# Altium PCB FG23_diff_PA_match_PCB.PcbDoc (part 2 of 2)
Units mil, origin at the board's own origin, x right, y up, seen from the top; angles counter-clockwise.
Board outline 1181.1 x 1771.65 mil, 4 copper layers (Top Layer, Signal Layer 2, Signal Layer 3, Bottom Layer), stack 62.992 mil thick; 85 components, 79 nets, 311 pads, 463 vias.
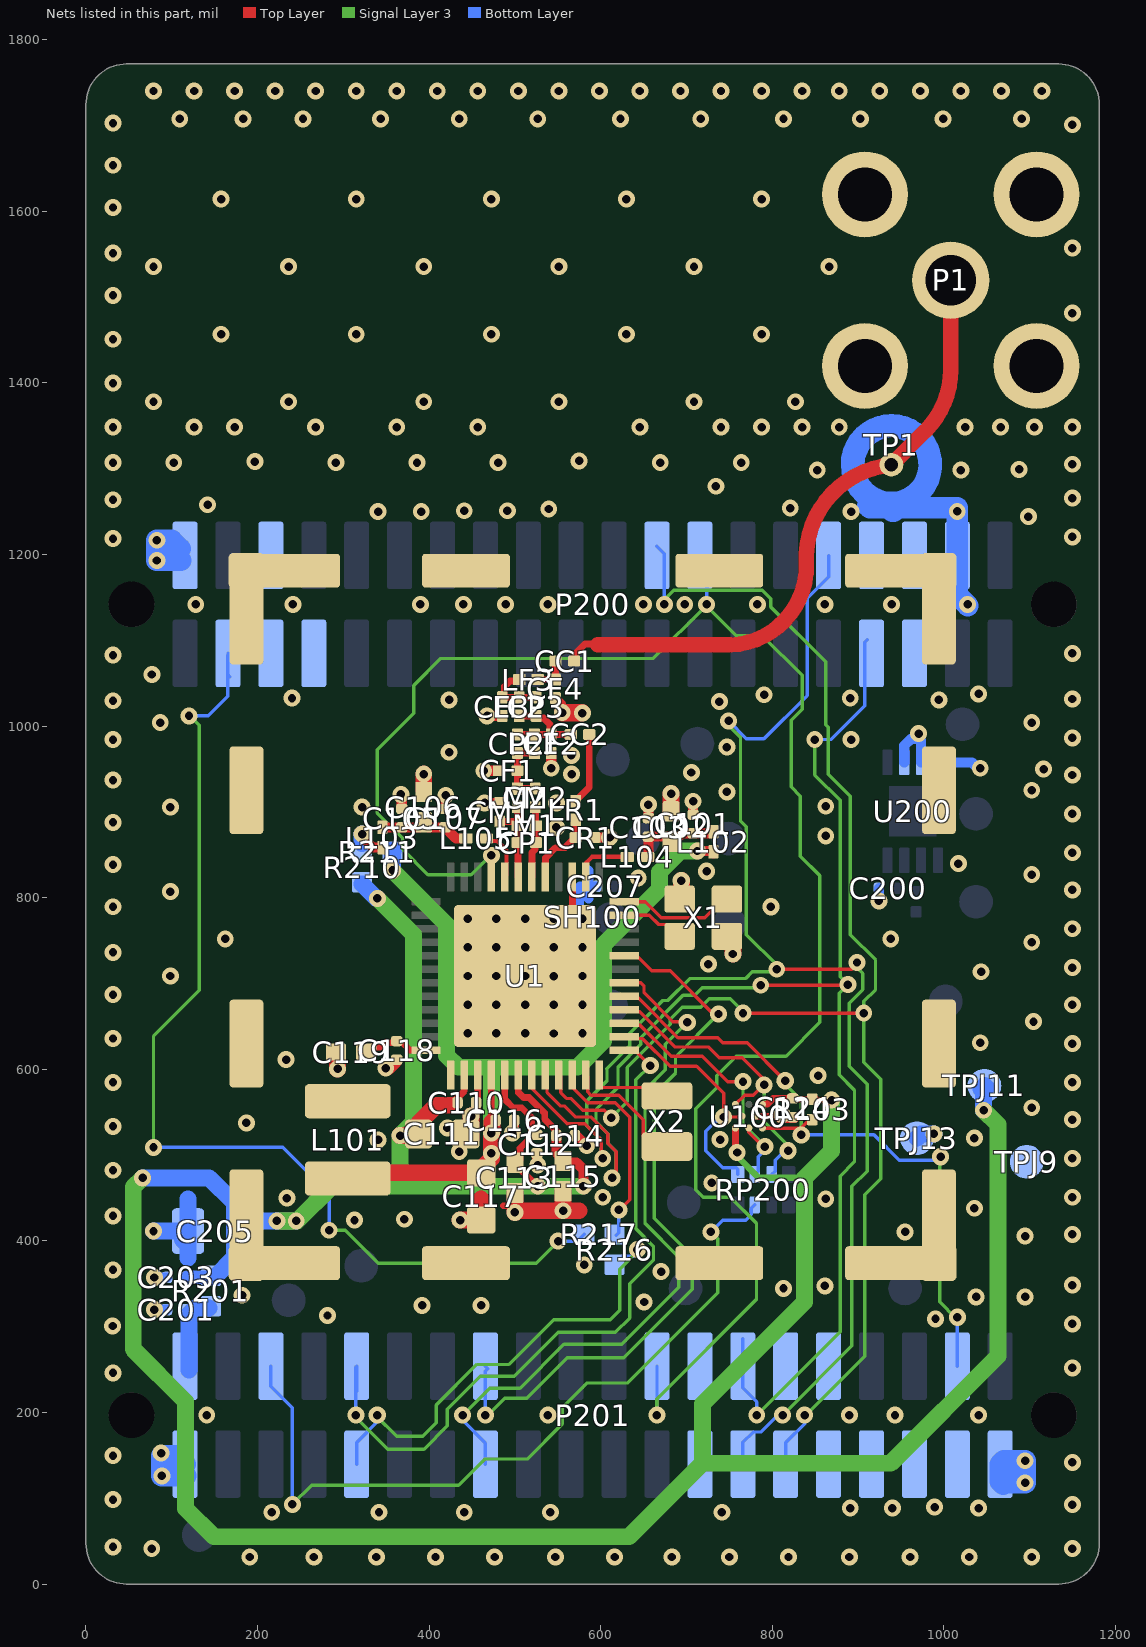
[diagram p4: the nets of this part, all layers, seen from the top]

## Via types
v1: diameter 19.68, hole 9.84, Top Layer to Bottom Layer, tented both sides, 383 vias
v2: diameter 20, hole 9.84, Top Layer to Bottom Layer, tented both sides, 80 vias

## Nets (pads, with @x,y where several pads share a name; then routed paths per layer and width w, separated by ;. In a path a pad name is that pad's centre, name@x,y a point inside that pad or via, vN(x,y) a via of type N, cw(c..) or ccw(c..) an arc to the next point about the centre after c; other vN are vias at no path point) (continued)
EFR32_PB03: P200.26 P201.24 U1.21 | length 2082.4
  Top Layer w7.87: U1.21@472.44,824.21 v1(472.44,849.21) 472.44,851.38 v1@473.43,851.38
  Signal Layer 3 w3.94: v1@473.43,855.31 473.43,851.38 448.82,826.77 398.62,826.77 369.09,856.3 369.09,869.09 339.57,898.62 339.57,972.44 381.89,1014.76 381.89,1047.24 413.39,1078.74 661.42,1078.74 722.93,1140.26 757.87,1105.31 788.39,1105.31 834.65,1059.06 834.65,1019.69 821.85,1006.89 821.85,929.13 832.68,918.31 832.68,848.43 855.31,825.79 855.31,654.53 815.94,615.16 757.87,615.16 735.07,592.36 735.07,578.58 710.63,554.13 710.63,459.65 719.49,450.79 750.98,450.79 781.5,420.28 781.5,331.69 665.35,215.55 v2(665.35,196.85)
  Bottom Layer w3.94: v2(665.35,196.85) 665.55,197.05 P201.24@665.55,253.94 ; P200.26@714.57,1186.02 725.39,1175.2 723.43,1173.23 v2(723.43,1141.73)
EFR32_PC00: P201.10 U1.1 | length 864.5
  Top Layer w3.94: U1.1@627.36,622.05 639.76,622.05 v2(657.61,604.2)
  Signal Layer 3 w3.94: v2@314.6,204.25 v2(314.6,196.85) 314.6,194.26 351.57,157.28 394.01,157.28 421.26,184.53 421.26,203.74 459.65,242.13 499.02,242.13 550.2,293.31 617.13,293.31 633.86,310.04 633.86,350.01 661.42,377.57 661.42,393.7 640.75,414.37 640.75,587.6 v2@657.48,604.33
  Bottom Layer w3.94: v2(314.6,196.85) 314.6,252.98 P201.10@315.55,253.94 P201.10@315.55,224.8
EFR32_PC01: RP200.1 U1.2 U100.D2 | length 295.2
  Top Layer w3.94: U1.2@627.36,637.8 629.33,635.83 648.62,635.83 681.1,603.35 711.61,603.35 743.15,571.81 v2(743.15,544.32) U100.D2@763.75,544.32 ; U100.D2@763.78,544.29 U100.D2@764.76,545.28
  Bottom Layer w3.94: v2(743.15,544.32) 739.2,544.32 722.44,527.56 722.44,504.92 742.13,485.24 757.87,485.24 759.84,483.27 RP200.1@759.84,477.36
EFR32_PC02: RP200.2 U1.3 U100.C3 | length 325.3
  Top Layer w3.94: U1.3@627.36,653.54 629.33,651.57 645.67,651.57 682.09,615.16 718.5,615.16 748.03,585.63 v1(765.75,585.63) ; U100.C3@772.64,531.5 772.64,526.57 v2@791.35,507.87
  Signal Layer 3 w3.94: v1(765.75,585.63) 765.75,536.42 791.34,510.83 v2(791.34,509.84)
  Bottom Layer w3.94: RP200.2@779.53,477.36 783.46,481.3 783.46,498.03 794.33,508.9 793.38,509.84 v2(791.34,509.84)
EFR32_PC03: RP200.3 U1.4 U100.E1 | length 371.8
  Top Layer w3.94: U1.4@627.36,669.29 639.76,669.29 641.73,667.32 644.68,667.32 686.02,625.98 725.39,625.98 738.19,613.19 764.76,613.19 790.39,587.56 v2(790.39,581.72) ; U100.E1@756.89,559.06 767.72,569.88 777.56,569.88 v2@788.88,581.2
  Signal Layer 3 w3.94: v2(790.39,581.72) 790.39,538.94 818.27,511.07 v2(818.27,505.05)
  Bottom Layer w3.94: RP200.3@799.21,477.36 803.15,481.3 803.15,494.09 816.19,507.13 v2(818.27,505.05)
EFR32_PC04: P201.38 R103.1 U1.5 U100.A3 | length 811.9
  Top Layer w3.94: U1.5@627.36,685.04 629.33,683.07 643.7,683.07 689.96,636.81 736.22,636.81 742.13,630.91 770.67,630.91 813.52,588.06 812.1,586.64 v2(815,586.64) ; U100.A3@788.39,531.5 788.39,531.3 833.07,531.3 843.11,541.34 R103.1@846.46,541.34
  Signal Layer 3 w3.94: v2(815,586.64) v2@810.85,586.64 ; v2(833.71,523.46) 833.71,563.79 v2@812.01,585.49 ; v2(996.06,498.03) 995.08,497.05 995.08,328.74 1013.78,310.04 1014.76,311.02 v2(1015.75,311.02) ; v2@810.85,586.64 808.02,586.64 806.87,585.49 v2@812.01,585.49 ; v2@810.85,586.64 v2@812.01,585.49
  Bottom Layer w3.94: v2(833.71,523.46) 918.46,523.46 947.83,494.09 992.13,494.09 v2(996.06,498.03) ; P201.38@1015.55,253.94 1015.55,310.83 v2(1015.75,311.02)
EFR32_PC05: P201.15 U1.6 | length 824.4
  Top Layer w3.94: U1.6@627.36,700.79 646.65,700.79 650.47,696.97 650.47,689 683.96,655.51 699.8,655.51 v2(700.79,654.53)
  Signal Layer 3 w3.94: v2(438.98,196.85) 470.47,228.35 505.91,228.35 557.09,279.53 624.63,279.53 690.94,345.84 690.94,380.91 651.57,420.28 651.57,575.68 675.2,599.3 675.2,628.94 v2(700.79,654.53)
  Bottom Layer w3.94: v2(438.98,196.85) 438.98,190.94 465.55,164.37 P201.15@465.55,139.76
EFR32_PC07: P201.16 U1.8 | length 872.3
  Top Layer w3.94: U1.8@627.36,732.28 641.73,732.28 659.26,714.76 680.83,714.76 731.22,664.37 v2(737.2,664.37)
  Signal Layer 3 w3.94: v2(465.55,196.85) 468.52,196.85 488.2,216.54 513.78,216.54 561.02,263.78 626.97,263.78 706.69,343.5 706.69,381.89 662.4,426.18 662.4,570.87 687.17,595.64 687.17,614.34 v2(737.2,664.37) ; v2@468.52,193.07 v2@470.41,194.96
  Bottom Layer w3.94: v2(465.55,196.85) 465.55,248.01 468.52,250.97 P201.16@465.55,253.94
EFR32_PD00: U1.48 X2.1 | length 78.4
  Top Layer w3.94: U1.48@598.43,579.72 599.41,578.74 672.24,578.74 X2.1@675.2,581.69
EFR32_PD01: U1.47 X2.2 | length 142.8
  Top Layer w3.94: U1.47@582.68,593.11 584.65,591.14 584.65,573.82 588.58,569.88 621.06,569.88 649.61,541.34 649.61,522.64 X2.2@675.2,522.64
EFR32_PD02: R216.1 R217.1 U1.46 | length 240.7
  Top Layer w3.94: U1.46@566.93,593.11 566.93,579.05 584.95,561.02 617.13,561.02 633.86,544.29 633.86,447.83 v1@622.05,436.02
  Signal Layer 3 w3.94: v1@621.06,437.01 v1@622.05,436.02
  Bottom Layer w3.94: R216.1@618.11,406.5 621.06,409.45 v1(621.06,436.02)
EFR32_PD03: P200.24 P201.29 U1.45 | length 1825.3
  Top Layer w3.94: U1.45@551.18,593.11 553.15,591.14 553.15,572.83 560.04,565.94 564.96,565.94 578.74,552.17 604.33,552.17 612.2,544.29 v1(612.2,543.31) ; v1(765.75,665.35) 765.75,669.36 767.75,667.36 768.74,666.37 770.7,668.34 772.71,666.34 773.69,665.35 v1(906.5,665.35)
  Signal Layer 3 w3.94: v1(612.2,543.31) 630.91,562.01 630.91,602.05 681.1,652.25 681.1,658.46 694.88,672.24 716.54,672.24 726.38,682.09 750.98,682.09 765.75,667.32 v1(765.75,665.35) ; v1(674.21,1141.73) 668.31,1141.73 685.04,1158.46 788.06,1158.46 798.27,1148.26 798.27,1138.74 862.2,1074.8 862.2,1001.66 865.16,998.71 865.16,943.9 890.75,918.31 890.75,756.89 920.28,727.36 920.28,692.91 906.5,679.13 v1(906.5,665.35) 906.5,608.27 926.18,588.58 926.18,472.44 907.48,453.74 907.48,265.44 838.89,196.85 v1(837.6,196.85)
  Bottom Layer w3.94: P200.24@665.35,1209.65 674.21,1200.79 v1(674.21,1141.73) ; P201.29@815.55,139.76 815.55,164.96 837.6,187.01 v1(837.6,196.85)
EFR32_PD04: P200.33 P201.28 U1.44 | length 1743.4
  Top Layer w3.94: U1.44@535.43,593.11 537.4,591.14 537.4,572.83 553.15,557.09 558.07,557.09 570.87,544.29 588.7,544.29 608.27,524.72 608.27,513.78 618.14,503.91 618.14,478.38 v1(613.19,473.43) ; v1(786.49,697.83) 887.18,697.83 v1(888.01,698.66)
  Signal Layer 3 w3.94: v1(613.19,473.43) 618.11,478.35 618.11,503.94 608.27,513.78 608.27,524.72 594.49,538.5 594.49,553.15 620.08,578.74 620.08,602.36 646.65,628.94 646.65,636.81 695.87,686.02 709.65,686.02 718.5,694.88 783.54,694.88 v1(786.49,697.83) ; v1(781.86,196.85) 878.94,293.92 878.94,475.39 895.67,492.13 895.67,575.79 877.95,593.5 877.95,688.61 v1(888.01,698.66) 878.94,707.74 878.94,913.39 849.41,942.91 v1(849.41,984.25)
  Bottom Layer w3.94: P201.28@765.55,285.96 P201.28@765.55,253.94 765.55,228.54 781.86,212.23 v1(781.86,196.85) ; v1(849.41,984.25) 868.11,984.25 907.48,1023.62 907.48,1097.44 P200.33@910.43,1100.39
EFR32_PD05: P200.32 P201.27 U1.43 | length 1901
  Top Layer w3.94: U1.43@519.69,593.11 519.69,577.76 561.02,536.42 581.5,536.42 600.39,517.52 v1@600.39,496.09 ; v1(805.16,716.57) 892.75,716.57 896.65,720.47 895.67,721.46 v1(898.62,724.41)
  Signal Layer 3 w3.94: v1(602.36,496.09) 600.39,498.06 600.39,517.52 583.66,534.25 583.66,562.99 607.28,586.61 607.28,600.39 ; 607.13,600.55 633.86,627.28 633.86,641.73 672.24,680.12 678,680.12 703.59,705.71 768.7,705.71 776.57,713.58 802.17,713.58 v1(805.16,716.57) 802.2,716.57 806.1,720.47 769.68,756.89 769.68,882.87 762.8,889.76 762.8,987.2 750,1000 750,1004.88 v1(748.96,1005.91) ; v1(812.01,196.85) 892.72,277.56 892.72,463.58 910.43,481.3 910.43,582.68 889.76,603.35 889.76,677.17 905.51,692.91 905.51,711.61 898.62,718.5 v1(898.62,724.41)
  Bottom Layer w3.94: v1(748.96,1005.91) 769.64,985.24 790.26,985.24 840.55,1035.53 840.55,1148.82 865.55,1173.82 P200.32@865.55,1198.82 ; P201.27@765.55,139.76 765.55,165.16 777.56,177.17 786.42,177.17 806.1,196.85 v1(812.01,196.85)
EXP_HEADER6: P201.6 RP200.7 | length 931.2
  Signal Layer 3 w3.94: v2@240.55,100.79 v2(240.55,92.82) 263.08,115.35 434.25,115.35 464.57,145.67 514.27,145.67 555.12,186.52 555.12,205.71 583.66,234.25 630.91,234.25 736.22,339.57 736.22,402.56 v2(728.35,410.43)
  Bottom Layer w3.94: P201.6@215.55,253.94 215.55,230.31 240.55,205.31 v2(240.55,92.82) ; v2(728.35,410.43) 742.13,424.21 769.07,424.21 775.59,430.74 775.59,437.99 RP200.7@779.53,441.93
EXP_HEADER9: P201.9 R216.2 | length 546.4
  Signal Layer 3 w3.94: v2@338.58,202.76 338.58,195.87 362.2,172.24 392.72,172.24 408.46,187.99 408.46,208.66 455.71,255.91 493.11,255.91 545.28,308.07 611.22,308.07 622.05,318.9 622.05,367.13 v1@645.67,390.75 ; v1@645.67,387.8 v1@648.62,387.8
  Bottom Layer w3.94: P201.9@315.55,139.76 315.55,164.96 339.57,188.98 v2(339.57,196.85) ; R216.2@625.98,381.89 637.8,381.89 642.75,386.84 v1(642.75,389.78)
GND: C101.2 C102.2 C103.2 C105.2 C106.2 C107.2 C110.2 C111.2 C112.2 C113.2 C114.2 C115.2 C116.2 C117.2 C118.2 C119.2 C124.2 C200.2 C201.2 C203.2 C205.2 C207.2 CF1.1 CF2.1 CF3.1 CF4.1 CM1.1 CR1.1 P1.2 P1.3 P1.4 P1.5 P200.2 P200.38 P201.1 P201.39 SH100.1 TP1.2 TPJ13.1 U1.0 U1.15 U1.39 U100.B2 U200.2 U200.3 U200.4 X1.2 X1.4 | length 1692.1
  Top Layer w7.87: v1@86.61,149.61 v1@87.6,150.59 ; U1.0@446.85,645.67 U1.0@452.76,639.76 ; C110.2@456.69,562.99 U1.39@456.69,593.11 ; 486.22,440.9 492.17,440.9 v1(500,433.07) ; U1.15@566.93,824.21 566.93,780.51 U1.0@570.87,776.57 ; U100.B2@780.51,545.28 804.13,545.28 v1@805.12,544.29
  Top Layer w11.81: v1@353.35,599.41 C118.2@362.2,608.27 ; C105.2@368.11,903.54 368.11,917.32 v1@369.09,918.31 ; C107.2@417.32,903.54 418.31,904.53 v1@418.31,920.28 ; v1(448.84,545.3) 449.47,545.3 448.82,545.95 454.72,551.85 C110.2@454.72,561.02 C110.2@454.72,562.01 ; v1(463.58,947.83) CF1.1@481.3,947.83 ; v1(464.57,910.43) CM1.1@482.28,910.43 ; v1(467.52,1011.81) CF3.1@485.24,1011.81 ; v1@497.05,527.56 499.02,529.53 C116.2@499.02,540.35 ; C112.2@525.59,501.97 525.59,489.17 v1(526.57,488.19) ; v1(542.32,950.79) CF2.1@542.32,968.5 ; CF4.1@547.24,1032.48 547.24,1031.69 553.61,1025.33 553.61,1017.25 v1(555.12,1015.75) v1@555.46,1015.4 ; C114.2@569.88,522.64 570.67,523.43 571.06,523.43 v1(583.64,510.85) ; v1@578.25,1015.4 v1(578.59,1015.06) ; CR1.1@592.52,870.08 609.25,870.08 v1@610.24,869.09 ; C103.2@655.51,892.72 v1(655.51,908.46) v1@655.51,910.43 ; C101.2@707.68,896.65 v1@707.68,910.43 ; v1@808.07,544.29 809.06,543.31 C124.2@825.79,543.31
  Top Layer w19.68: C119.2@291.34,620.08 293.31,618.11 v1(293.31,600.39) ; C106.2@393.7,925.2 v1(393.7,943.9) ; v1(436.02,424.21) C117.2@453.74,424.21 ; C111.2@448.84,518.72 v1(448.84,545.3) ; C117.2@460.63,429.13 460.63,448.82 ; v1(500,433.07) 501.97,435.04 574.8,435.04 ; v1@500,435.04 C113.2@500,455.71 ; v1(556.1,435.04) C115.2@556.1,456.69 ; C102.2@682.09,899.61 C102.2@682.09,900.59 v1(682.09,921.26) ; X1.2@692.91,800.2 694.88,802.17 693.9,803.15 v2(693.9,819.88) ; X1.4@752.95,755.91 754.92,753.94 753.97,752.99 v2(753.97,734.29)
  Top Layer w20: v1@555.46,1015.4 v1@578.25,1015.4
  Bottom Layer w10: v1(31.5,366.14) v1@34.45,366.14 ; v1@76.77,319.88 v1@78.74,319.88 ; v1@77.76,357.29 v1(79.72,357.28) C203.2@94.49,357.29 ; v1(79.72,319.88) v1@78.74,319.88 ; C201.2@94.49,319.88 v1@78.74,319.88
  Bottom Layer w11.81: v1(79.72,319.88) C201.2@94.49,319.88 ; v1(79.72,357.28) C203.2@94.49,357.29 ; v1@574.8,771.65 574.8,812.01 575.79,812.99 585.63,812.99 ; 585.63,799.21 585.63,812.99 ; 585.63,831.69 585.63,812.99 ; C207.2@594.49,812.99 585.63,812.99 ; v1@921.26,793.31 v1(924.21,796.26) v1@924.21,801.18 ; v1@924.21,803.15 C200.2@924.21,811.02 ; U200.2@953.74,957.68 953.74,977.36 961.12,984.74 971.95,984.74 973.43,983.27 U200.3@973.43,957.68 ; U200.4@993.11,957.68 1032.48,957.68 v1@1040.35,949.8
  Bottom Layer w19.68: v1(78.74,411.42) 114.17,411.42 118.11,407.48 112.2,401.57 C205.2@117.13,396.65 ; 119.09,379.92 C205.2@119.09,411.42 119.09,448.82 ; P200.38@1015.55,1198.82 P200.38@1015.75,1199.02
  Bottom Layer w20: TPJ13.1@968.5,519.69 973.43,524.61 v1(988.19,524.61)
  Bottom Layer w25: P200.2@109.65,1206.69 99.8,1216.54 v1(82.68,1216.54) v1(82.68,1192.91) P200.2@110.24,1192.91 ; P201.1@114.17,127.95 116.14,125.98 v1(88.58,125.98) 88.58,149.61 105.71,149.61 P201.1@115.55,139.76 ; 911.42,1256.89 913.68,1254.63 939.65,1254.63 939.65,1250.2 941.45,1250.2 945.88,1254.63 1015.55,1254.63 v1(1015.55,1250.2) P200.38@1015.55,1198.82 1015.55,1152.51 v1@1027.61,1140.45 ; P201.39@1065.55,139.76 1090.55,139.76 v1(1094.49,143.7) ; P201.39@1065.55,139.76 1065.55,119.49 1068.9,116.14 1070.87,118.11 v1(1094.49,118.11) v1(1094.49,143.7) ; P201.39@1065.55,139.76 1069.49,143.7 v1(1094.49,143.7)
  other v1: 190.87,31.5 265.67,31.5 338.5,31.5 407.4,31.5 476.3,31.5 547.17,31.5 616.06,31.5 682.99,31.5 749.92,31.5 818.82,31.5 889.69,31.5 960.55,31.5 1029.45,31.5 1102.28,31.5 76.69,41.34 1149.61,41.34 31.5,43.31 216.54,83.66 341.54,83.66 440.94,83.66 541.34,83.66 741.14,83.66 890.75,88.58 939.96,88.58 1040.35,88.58 989.17,89.57 1149.61,92.52 31.5,98.43 1149.61,141.73 31.5,149.61 87.6,152.56 140.75,196.85 538.39,196.85 889.76,196.85 942.91,196.85 1040.35,196.85 31.5,246.06 1149.61,251.97 30.96,300.73 1149.61,303.15 990.16,309.06 281.5,312.99 391.73,324.8 460.63,324.8 650.59,328.74 1037.4,334.65 1094.49,334.65 182.09,336.61 812.99,344.49 861.22,347.44 1149.61,348.43 670.31,364.19 580.71,372.05 1094.49,405.51 1149.61,407.48 954.72,410.43 312.99,424.21 371.06,425.2 31.5,429.13 1035.43,437.99 862.2,448.82 234.25,449.8 602.36,450.79 1149.61,450.79 729.33,467.52 31.5,482.28 1149.61,496.06 435.04,503.94 340.55,517.72 739.17,518.07 1035.43,519.68 497.05,525.59 421.26,531.5 31.5,533.47 187.01,537.4 1149.61,541.34 811.02,547.24 1102.36,555.12 31.5,584.65 1149.61,584.65 853.35,592.52 349.43,601.41 233.27,611.22 1149.61,629.92 1042.32,630.91 31.5,635.83 444.88,641.73 478.35,641.73 511.81,641.73 545.26,641.67 578.74,641.73 1104.33,655.51 444.88,675.2 478.35,675.2 511.81,675.2 545.26,675.13 578.74,675.2 1149.61,675.2 31.5,687.01 98.43,708.66 444.88,708.66 478.35,708.66 511.81,708.66 545.26,708.6 578.74,708.66 1043.31,713.58 1149.61,718.5 725.39,722.44 31.5,736.22 444.88,742.13 478.35,742.13 511.81,742.13 545.26,742.06 578.74,742.13 1102.36,748.03 162.4,751.97 937.99,751.97 1149.61,763.78 444.88,775.59 478.35,775.59 511.81,775.59 545.26,775.53 578.74,775.59 31.5,789.37 98.43,807.09 1149.61,809.06 643.7,822.83 1102.36,826.77 31.5,838.58 1016.73,839.57 1149.61,852.36 610.24,870.08 862.2,872.05 548.23,881.89 31.5,887.8 1149.61,897.64 98.43,905.51 321.85,905.51 862.2,906.5 548.23,910.43 707.68,912.4 419.29,919.29 367.13,920.28 747.05,923.23 1102.36,925.2 31.5,937.01 1149.61,942.91 565.94,943.9 705.71,945.87 1116.14,949.8 1042.32,950.79 565.8,965.84 423.23,969.49 747.05,975.39 31.5,984.25 891.73,984.25 1149.61,986.22 970.47,991.14 86.61,1003.94 1102.36,1003.94 738.19,1028.54 31.5,1029.53 423.23,1030.51 994.09,1030.51 1149.61,1031.5 240.16,1032.48 890.75,1032.48 790.35,1036.42 1040.35,1037.4 76.77,1060.04 31.5,1082.68 1149.61,1084.65 127.95,1141.73 241.14,1141.73 389.76,1141.73 439.96,1141.73 489.17,1141.73 538.39,1141.73 649.61,1141.73 697.83,1141.73 782.52,1141.73 861.26,1141.73 938.98,1141.73 1027.61,1141.73 31.5,1218.5 1149.61,1220.47 1098.43,1244.09 340.55,1250 390.75,1250 891.73,1250 440.94,1250.98 491.14,1250.98 539.37,1252.95 820.87,1253.94 141.73,1257.87 31.5,1263.78 1149.61,1265.75 734.25,1279.53 852.36,1298.23 1019.68,1298.23 1087.6,1299.21 1149.61,1305.12 31.5,1307.09 102.36,1307.09 291.34,1307.09 385.83,1307.09 480.31,1307.09 669.29,1307.09 763.78,1307.09 196.86,1308.13 574.83,1309.12 31.5,1348.43 125.98,1348.43 173.23,1348.43 267.72,1348.43 362.2,1348.43 456.69,1348.43 645.67,1348.43 740.16,1348.43 787.4,1348.43 834.65,1348.43 877.95,1348.43 1024.61,1348.43 1065.94,1348.43 1105.31,1348.43 1149.61,1348.43 78.74,1377.95 236.22,1377.95 393.7,1377.95 551.18,1377.95 708.66,1377.95 826.77,1377.95 31.5,1399.61 31.5,1450.79 157.48,1456.69 314.96,1456.69 472.44,1456.69 629.92,1456.69 787.4,1456.69 1149.61,1481.3 31.5,1501.97 78.74,1535.43 236.22,1535.43 393.7,1535.43 551.18,1535.43 708.66,1535.43 866.14,1535.43 31.5,1551.18 1149.61,1557.09 31.5,1604.33 157.48,1614.17 314.96,1614.17 472.44,1614.17 629.92,1614.17 787.4,1614.17 31.5,1653.54 1149.61,1700.79 31.5,1702.76 109.25,1707.68 183.07,1707.68 252.95,1707.68 343.5,1707.68 435.04,1707.68 526.57,1707.68 623.03,1707.68 716.54,1707.68 812.99,1707.68 902.56,1707.68 999.02,1707.68 1090.55,1707.68 78.74,1740.16 125.98,1740.16 173.23,1740.16 220.47,1740.16 267.72,1740.16 314.96,1740.16 362.2,1740.16 409.45,1740.16 456.69,1740.16 503.94,1740.16 551.18,1740.16 598.43,1740.16 645.67,1740.16 692.91,1740.16 740.16,1740.16 787.4,1740.16 834.65,1740.16 877.95,1740.16 925.2,1740.16 972.44,1740.16 1019.69,1740.16 1066.93,1740.16 1114.17,1740.16
  other v2: 798.23,789.37 723.43,830.71
JOYSTICK: P200.3 R217.2 | length 1260.4
  Signal Layer 3 w3.94: v1(78.74,508.86) 78.74,638.78 131.89,691.93 131.89,1000.98 121.06,1011.81 v2(120.08,1011.81) ; v1(283.46,412.4) 302.17,412.4 340.55,374.02 524.61,374.02 v1(550.2,399.61) v1@553.15,402.56
  Bottom Layer w3.94: v1(78.74,508.86) 229.33,508.86 283.46,454.72 v1@283.46,413.39 ; v2(120.08,1011.81) 142.72,1011.81 165.35,1034.45 P200.3@165.35,1082.68 ; P200.3@165.55,1084.65 165.55,1059.84 P200.3@167.81,1057.58 ; v1@551.18,398.62 552.17,399.61 572.83,399.61 R217.2@580.71,407.48
NetC101_1: C101.1 C102.1 C103.1 L102.2 L104.1 | length 97.1
  Top Layer w11.81: L104.1@655.51,850.39 C103.1@655.51,871.06 690.94,871.06 694.88,875 C101.1@707.68,875 L102.2@730.31,875
NetC105_1: C105.1 C106.1 C107.1 L103.2 L105.1 | length 107.6
  Top Layer w11.81: L103.2@345.47,881.89 C105.1@368.11,881.89 387.8,881.89 C106.1@393.7,887.8 399.61,881.89 C107.1@418.31,881.89 431.1,869.09 L105.1@442.91,869.09
NetC118_1: C118.1 C119.1 U1.36 | length 68.7
  Top Layer w7.87: C119.1@333.66,625.98 345.47,625.98 350.39,630.91 369.09,630.91 377.95,622.05 U1.36@396.26,622.05 U1.36@396.65,622.05
NetCC1_1: CC1.1 CF4.2 LF3.2 | length 42.5
  Top Layer w8: LF3.2@526.38,1054.13 CF4.2@547.24,1054.13 CC1.1@547.24,1075.79
NetCC1_2: CC1.2 P1.1 TP1.1 | length 744.1
  Top Layer w8: CC1.2@568.9,1075.79 569.88,1076.77 569.88,1083.76 581.6,1095.47 592.52,1095.47
  Top Layer w18: 596.46,1094.49 751.38,1094.49 ccw(c747.74,1186.32) 839.28,1178.18 839.57,1178.46 839.57,1201.77 ; 839.62,1199.8 cw(c947.98,1196.08) TP1.1@938.98,1304.13 ; TP1.1@938.78,1304.53 978.58,1344.33 ccw(c907.87,1415.04) 1007.87,1415.04 P1.1@1007.87,1519.68
NetCC2_1: CC2.1 LR1.2 | length 84.5
  Top Layer w8: LR1.2@570.87,912.2 570.87,913.19 586.61,928.94 CC2.1@586.61,990.16
NetCC2_2: CC2.2 CF2.2 CP2.2 CP3.1 LF1.2 LF2.1 | length 112.2
  Top Layer w8: CP2.2@502.95,990.16 503.05,990.06 522.54,990.06 LF1.2@522.64,990.16 ; LF2.1@504.92,1011.81 505.02,1011.91 524.51,1011.91 CP3.1@524.61,1011.81 ; LF1.2@523.62,990.16 523.72,990.06 542.22,990.06 CF2.2@542.32,990.16 ; CP3.1@525.59,1010.56 526.91,1009.24 533.54,1009.24 540.94,1001.85 540.94,991.54 CF2.2@542.32,990.16 ; CC2.2@564.96,990.16 CF2.2@542.32,990.16
NetCF1_2: CF1.2 CM2.2 CP2.1 LF1.1 LM2.2 | length 82.3
  Top Layer w8: LM2.2@501.97,927.17 502.95,928.15 CF1.2@502.95,947.83 CP2.1@502.95,968.5 503.05,968.6 522.54,968.6 LF1.1@522.64,968.5 ; LM2.2@502.95,926.97 503.05,927.07 523.52,927.07 CM2.2@523.62,927.17
NetCF3_2: CF3.2 CP3.2 LF2.2 LF3.1 | length 74.4
  Top Layer w8: LF3.1@504.13,1054.13 502.55,1052.55 494.02,1052.55 487.54,1046.07 487.54,1035.76 CF3.2@485.24,1033.46 485.33,1033.37 504.82,1033.37 LF2.2@504.92,1033.27 505.02,1033.37 524.51,1033.37 CP3.2@525.59,1034.45
NetCM1_2: CM1.2 CP1.1 LM1.1 LM2.1 U1.19 | length 95.9
  Top Layer w8: CM1.2@482.28,888.78 LM1.1@501.97,888.78 ; LM1.1@502.95,882.87 503.05,882.78 503.05,864.27 CP1.1@502.95,864.17 503.61,863.52 503.61,824.54 U1.19@503.94,824.21 ; LM1.1@502.95,883.86 LM1.1@503.05,883.96 ; LM2.1@502.95,905.71 503.05,905.61 LM1.1@503.05,888.78
NetCM2_1: CM2.1 CP1.2 LM1.2 U1.18 | length 84.4
  Top Layer w8: U1.18@519.69,824.21 520.02,824.54 520.02,852.69 523.62,856.3 CP1.2@523.62,863.19 ; CM2.1@523.62,905.51 524.02,905.12 524.02,882.48 LM1.2@524.61,881.89 ; CP1.2@524.61,864.17 524.51,864.27 524.51,883.76 LM1.2@524.61,883.86
NetCR1_2: CR1.2 LR1.1 U1.17 | length 88
  Top Layer w8: U1.17@535.43,824.21 535.76,824.54 535.76,846.49 547.48,858.2 558.2,858.2 570.08,870.08 CR1.2@570.87,870.08 LR1.1@570.87,890.75
NetL101_1: L101.1 U1.37
NetL104_2: L104.2 U1.14 | length 68.5
  Top Layer w4.92: U1.14@582.68,824.21 582.68,840.55 589.66,847.54 628.84,847.54 628.94,847.44 L104.2@630.91,847.44 L104.2@631.89,847.44
NetL105_2: L105.2 U1.20 | length 60.4
  Top Layer w4.92: L105.2@465.55,866.14 479.33,866.14 490.16,855.31 490.16,826.77 U1.20@488.19,824.8
NetU1_11: U1.11 X1.3 | length 74.8
  Top Layer w3.94: U1.11@627.36,779.53 656.5,779.53 667.33,768.7 676.87,768.7 678.15,768.7 X1.3@691.93,754.92
NetU1_12: U1.12 X1.1 | length 136.4
  Top Layer w3.94: U1.12@627.36,795.28 651.88,795.28 670.59,776.57 721.45,776.57 743.11,798.22 X1.1@747.04,798.22
PAVDD: L103.1 R210.1 R211.2 | length 44.9
  Top Layer w11.81: v1(321.85,874.02) 320.87,874.02 319.88,873.03 334.65,858.27 L103.1@345.47,858.27
  Bottom Layer w19.68: R211.2@321.85,863.18 v1(321.85,874.02)
USB_VBUS: P200.35
USB_VREG: P200.36
VDCDC: C116.1 C117.1 L101.2 L102.1 R211.1 U1.40 | length 1177.1
  Top Layer w7.87: C116.1@472.44,545.28 472.44,572.83 U1.40@472.44,588.78
  Top Layer w11.81: v1(712.6,854.33) 728.35,854.33 L102.1@731.3,851.38
  Top Layer w19.68: L101.2@339.57,479.33 C117.1@454.72,479.33 ; C117.1@455.71,479.33 472.44,496.06 v1(472.44,501.97) ; v1@472.46,505.88 v1(472.46,525.62) 473.43,526.58 C116.1@473.43,538.78
  Signal Layer 3 w19.68: v2(357.28,831.69) 420.28,768.7 420.28,616.14 434.06,602.36 472.46,602.36 ; v1(472.44,501.97) v1@472.44,523.67 ; v1(472.46,525.62) 472.46,602.36 ; v1(712.6,854.33) 692.91,854.33 668.31,829.72 668.31,810.04 ; 472.46,602.36 572.78,602.36 603.35,632.93 603.35,745.08 ; 603.35,745.08 668.31,810.04 ; 603.35,745.08 668.31,810.04
  Bottom Layer w19.68: v2(357.28,831.69) 357.28,854.3 R211.1@358.29,855.3
VMCU: C110.1 C111.1 C112.1 C113.1 C114.1 C115.1 C124.1 C203.1 C205.1 R103.2 R201.2 R210.2 TPJ11.1 U1.38 U1.41 U1.42 U100.A1 U100.E3 | length 4085.9
  Top Layer w7.87: 418.31,552.17 424.21,552.17 C110.1@433.07,561.02 ; C110.1@429.13,561.02 429.13,562.01 429.13,562.99 440.95,574.8 U1.38@440.95,593.11 ; U1.41@488.18,593.7 U1.41@488.18,593.11 ; C113.1@498.03,495.08 505.91,495.08 505.91,507.87 519.68,521.65 519.68,543.31 507.87,555.12 498.03,555.12 488.19,564.96 488.19,573.82 ; C113.1@500,491.14 500,489.71 523.17,466.54 v1@526.57,466.54 ; U1.42@503.94,590.55 503.94,572.83 509.84,566.93 516.59,566.93 534.61,548.91 534.61,541.76 548.79,527.59 C114.1@549.21,527.17 ; v1@756.89,508.83 U100.E3@756.89,531.5 ; U100.A1@788.39,559.06 793.98,559.06 800.87,565.94 812.6,565.94 817.38,565.94 818.52,564.8 822.68,564.8 C124.1@823.82,565.94 C124.1@824.8,564.96 ; C124.1@826.77,564.96 R103.2@845.47,564.96 ; R103.2@846.46,564.96 848.43,566.93 851.38,563.98 v2(869.09,563.98) ; 488.19,573.82 U1.41@488.18,593.11 ; 488.19,573.82 U1.41@488.19,593.11
  Top Layer w11.81: 414.37,558.07 418.31,562.01 429.13,562.01 C110.1@433.07,562.01 ; C114.1@548.23,520.67 548.23,502.95 C115.1@556.1,495.08 ; C115.1@552.17,498.03 C115.1@553.15,497.05 ; C115.1@561.02,491.14 571.85,491.14 579.73,483.26 v1(579.73,463.58)
  Top Layer w19.68: v1(366.14,522.64) C111.1@386.81,522.64 ; C111.1@387.8,518.7 C111.1@386.81,518.7 ; 419.29,558.07 414.37,558.07 408.46,558.07 386.81,536.42 C111.1@386.81,522.64 ; C111.1@386.81,518.7 390.75,522.64 C111.1@386.81,522.64 ; C111.1@386.81,518.7 C111.1@386.81,522.64
  Signal Layer 3 w7.87: v1(758.9,502.98) 758.9,500.74 757.87,499.72 784.17,473.43 837.6,473.43
  Signal Layer 3 w19.68: v2(65.94,473.43) 55.12,462.6 55.12,273.62 116.14,212.6 116.14,88.18 149.2,55.12 632.87,55.12 718.5,140.75 ; v1(222.44,423.23) v1(245.08,423.23) 246.06,423.23 286.42,463.58 366.14,463.58 ; v2(339.68,799.1) 381.89,756.89 381.89,538.39 v1(366.14,522.64) 366.14,463.58 ; v1(579.73,463.58) v1(526.57,463.58) 366.14,463.58 ; v2(869.09,563.98) 869.09,504.92 837.6,473.43 837.6,328.74 718.5,209.65 718.5,140.75 ; v1(1046.26,552.17) 1062.99,535.43 1062.99,265.75 937.99,140.75 718.5,140.75
  Bottom Layer w15.75: C203.1@118.11,357.29 R201.2@149.61,357.29
  Bottom Layer w19.68: v2(65.94,473.43) 143.7,473.43 173.23,443.9 C205.1@173.23,407.48 ; R201.2@148.62,358.27 149.61,357.29 173.23,380.91 C205.1@173.23,407.48 ; C205.1@179.13,423.23 v1(222.44,423.23) v1(245.08,423.23) ; C205.1@182.09,407.48 C205.1@173.23,407.48 ; R210.2@321.85,815.94 338.69,799.1 v2(339.68,799.1)
  Bottom Layer w20: v1(1046.26,552.17) 1046.26,573.82 TPJ11.1@1043.31,576.77 ; TPJ11.1@1047.24,580.71 TPJ11.1@1045.27,578.74 ; TPJ11.1@1049.21,578.74 1047.24,576.77 TPJ11.1@1045.27,578.74 ; TPJ11.1@1043.31,576.77 TPJ11.1@1045.27,578.74 ; TPJ11.1@1043.31,576.77 TPJ11.1@1045.27,578.74
  Bottom Layer w29.53: C205.1@182.09,407.48 186.02,411.42 C205.1@182.09,411.42
VMCU_IN: C201.1 P201.2 R201.1 | length 92
  Bottom Layer w19.68: P201.2@120.08,249.41 120.08,314.96 126.97,321.85 R201.1@143.7,321.85
VRF: TPJ9.1
WSTK_F21: P200.34
WSTK_P22: P201.25
WSTK_P23: P201.26
WSTK_P27: P201.30
WSTK_P28: P201.31
WSTK_P29: P201.32
WSTK_P30: P201.33
WSTK_P32: P201.35
WSTK_P34: P201.37
WSTK_P38: P200.5
WSTK_P39: P200.6
WSTK_P40: P200.7
pads on no net: P200.M1 P200.M2 P201.40 P201.M1 P201.M2 RP200.4 RP200.5 TPJ18.1 TPJ19.1 TPJ20.1 U1.16 U100.C1 U200.9

## Polygon pours and split planes (outlines as drawn)
GND on Signal Layer 2 "GND_L2" (solid, remove dead copper, pour order 48): 0,0 0,1771.65 1181.1,1771.65 1181.1,0
GND on Bottom Layer "GND_L4" (solid, remove dead copper, pour order 54): 0,0 0,1771.65 1181.1,1771.65 1181.1,0
GND on Top Layer "GND_L1" (solid, remove dead copper, pour order 56): 0,0 0,1771.65 1181.1,1771.65 1181.1,0
GND on Signal Layer 3 "GND_L3" (solid, remove dead copper, pour order 52): 0,0 0,1771.65 1181.1,1771.65 1181.1,0

## Other copper
Top Layer:
  rectangle net GND: 555.12,931.1 576.77,976.1
  rectangle net GND: 538.39,871.06 558.07,921.26
  region net GND: 558.07,921.26 576.77,931.1 555.12,931.1 538.39,921.26
  pour cut-out: 496.06,853.35 605.31,853.35 605.31,1095.47 520.67,1095.47 496.06,1070.87
  pour cut-out: 724.41,869.09 724.41,920.77 709.15,936.02 665.35,936.02 654.53,925.2 605.31,925.2 605.31,869.09
  region net NetCC1_2: 588.58,1091.54 571.85,1091.54 593.5,1085.63 595.47,1085.63
  region net NetCC1_2: 580.71,1099.41 591.54,1099.41 595.47,1103.35
  pour cut-out: 443.9,891.73 443.9,959.65 368.11,959.65 334.65,926.18 334.65,891.73
  pour cut-out: 496.06,1070.87 476.38,1070.87 443.9,1038.39 443.9,853.35 496.06,853.35
  region net NetL101_1: 305.61,543.31 305.61,582.68 356.3,582.68 383.86,610.23 429.62,610.24 429.62,576.77 389.76,576.77 356.3,543.31
  pour cut-out: 686.52,835.63 702.76,835.63 718.5,819.88 768.21,819.88 774.61,813.49 774.61,731.3 760.83,717.52 748.03,717.52 733.27,732.28 659.45,732.28 659.45,808.56
  region net GND: 441.93,497.05 453.74,508.86 453.74,530.51 440.94,543.31 415.35,543.31 415.35,497.05
Bottom Layer:
  pour cut-out: 762.8,1056.59 712.6,1056.59 712.6,1041.83 762.8,1041.83
  pour cut-out: 915.35,1056.59 865.16,1056.59 865.16,1041.83 915.35,1041.83
  pour cut-out: 316.93,1241.63 266.73,1241.63 266.73,1226.87 316.93,1226.87
  pour cut-out: 563.48,1124.02 513.29,1124.02 513.29,1109.25 563.48,1109.25
  pour cut-out: 364.17,1056.59 313.98,1056.59 313.98,1041.83 364.17,1041.83
  pour cut-out: 617.13,1241.63 567.91,1241.63 567.91,1226.87 617.13,1226.87
  pour cut-out: 809.06,111.67 571.91,111.67 571.91,96.91 809.06,96.91
  pour cut-out: 521.65,111.67 321.91,111.67 321.91,96.91 521.65,96.91
  pour cut-out: 518.7,296.75 176.18,296.75 176.18,281.99 518.7,281.99
  pour cut-out: 811.02,296.75 671.26,296.75 671.26,281.99 811.02,281.99
  pour cut-out: 914.37,1210.63 914.37,1135.83 929.13,1135.83 929.13,1210.63
  pour cut-out: 830.71,467.03 748.03,467.03 748.03,452.26 830.71,452.26

## Silkscreen, mask and mechanical layers (free items; w line width, h text height)
Top Overlay:
  text "FG23 DIFF PA  / Match / Mod DT point" at 57.09,1440.94 h118.11
Bottom Overlay:
  lines w6: 302.17,808.07 302.17,796.26 313.98,796.26 ; 302.17,845.47 302.17,835.63 306.1,835.63 ; 302.17,863.19 302.17,873.03 306.1,873.03 ; 329.72,796.26 341.54,796.26 341.54,808.07 ; 329.72,873.03 341.54,873.03 ; 341.54,821.85 341.54,833.66 353.35,833.66 ; 367.13,833.66 378.94,833.66 378.94,845.47 ; 367.13,873.03 378.94,873.03 378.94,861.22 ; 559.06,400.59 559.06,388.78 570.87,388.78 ; 559.06,416.34 559.06,428.15 570.87,428.15 ; 584.65,388.78 596.46,388.78 596.46,376.97 ; 596.46,363.19 596.46,351.38 608.27,351.38 ; 598.43,424.21 598.43,428.15 608.27,428.15 ; 624.02,351.38 635.83,351.38 635.83,363.19 ; 625.98,428.15 635.83,428.15 635.83,424.21 ; 635.83,388.78 635.83,400.59
  text "PCB9600_B00" at 433.07,1652.56 h62.99
  text "PAVDD / Config." at 484.25,883.86 h62.99
  text "VDCDC" at 544.29,836.61 h47.24
  text "VMCU" at 259.84,750.98 h47.24 r270
  text "EFR32_PD02 / Config." at 740.16,434.06 h62.99
  text "JOYSTICK" at 547.24,392.72 h47.24
  text "EXP9" at 644.68,334.65 h47.24 r270
Top Solder:
  the board outline again, w31.5
Bottom Solder:
  the board outline again, w31.5
BOARD OUTLINE 1:
  the board outline again, w3.94
Mechanical 11:
  the board outline again, w3.94
Mechanical 12:
  the board outline again, w3.94
Mechanical 15:
  lines w1: 2754.76,-1924.21 2762.96,-1924.21 ; 2758.86,-1928.31 2758.86,-1920.11
  lines w3.94: -19.69,0 19.68,0 ; 0,-19.69 0,19.68
Mechanical 16:
  lines w3.94: -19.69,0 19.68,0 ; 0,-19.69 0,19.68
Mechanical 26:
  lines w7.87: -4818.9,-1584.65 -4754.92,-1584.65 ; -4818.9,252.95 -4754.92,252.95 ; -4818.9,2090.55 -4754.92,2090.55 ; -2667.32,-3484.25 -2667.32,-3421.26 ; -2667.32,3929.13 -2667.32,3992.13 ; -579.72,-3484.25 -579.72,-3421.26 ; -579.72,3929.13 -579.72,3992.13 ; 1507.87,-3484.25 1507.87,-3421.26 ; 1507.87,3929.13 1507.87,3992.13 ; 3595.47,-3484.25 3595.47,-3421.26 ; 3595.47,3929.13 3595.47,3992.13 ; 5683.07,-1583.66 5747.05,-1583.66 ; 5683.07,253.94 5747.05,253.94 ; 5683.07,2091.54 5747.05,2091.54 ; 5747.05,-3484.25 -4818.9,-3484.25 -4818.9,3992.13 5747.05,3992.13 5747.05,-3483.27 ; -4754.92,-3421.26 -4754.92,3929.13 5683.07,3929.13 5683.07,-3421.26 -4754.92,-3421.26
  text "5" at -3717.52,3949.8 h19.68
  text "4" at -1629.92,3948.82 h19.68
  text "3" at 457.68,3948.82 h19.68
  text "2" at 2545.28,3948.82 h19.68
  text "1" at 4636.81,3948.82 h19.68
  text "D" at 5709.65,3000 h19.68
  text "D" at -4792.32,2999.02 h19.68
  text "C" at 5709.65,1161.42 h19.68
  text "C" at -4792.32,1160.43 h19.68
  text "B" at 5709.65,-676.18 h19.68
  text "B" at -4792.32,-677.17 h19.68
  text "A" at 5709.65,-2512.8 h19.68
  text "A" at -4792.32,-2513.78 h19.68
  text "5" at -3717.52,-3463.58 h19.68
  text "4" at -1629.92,-3464.57 h19.68
  text "3" at 457.68,-3464.57 h19.68
  text "2" at 2545.28,-3464.57 h19.68
  text "1" at 4636.81,-3464.57 h19.68
Mechanical 27:
  drawing of 28 lines, arcs and shapes, not listed
  text "Board Title" at 2942.91,-2438.98 h98.43
  text "'.CreativeName' '.SubGfreq' '.SubGpower' Radio Board" at 2998.03,-2657.48 h137.8
  text "Page Title" at 2942.91,-2821.85 h98.43
  text "Designed:" at 1673.23,-2969.49 h66.93
  text "Approved:" at 2311.02,-2969.49 h66.93
  text "Top Assembly" at 2998.03,-2975.39 h125.98
  text ".DrawnByShort" at 1733.27,-3067.91 h86.61
  text "RGU" at 2365.16,-3067.91 h86.61
  text "Revision" at 5222.44,-3098.43 h66.93
  text "Document number" at 2942.91,-3109.25 h92.52
  text "Size" at 1673.23,-3156.5 h66.93
  text "BOM Doc. No:" at 1867.13,-3156.5 h66.93
  text ".BoardRevision" at 5233.27,-3218.5 h106.3
  text ".BoardName" at 2998.03,-3222.44 h125.98
  text "A4" at 1695.87,-3229.33 h78.74
  text "<>" at 1889.76,-3229.33 h78.74
  text "Design Created Date:" at 1673.23,-3321.85 h66.93
  text "Sheet Created Date:" at 2920.28,-3321.85 h66.93
  text "Sheet Modified Date:" at 4039.37,-3321.85 h66.93
  text "Sheet" at 5222.44,-3321.85 h66.93
  text "Monday, July 13, 2020" at 1715.55,-3398.62 h66.93
  text "Monday, July 13, 2020" at 2964.57,-3398.62 h66.93
  text "'.Print_Date'" at 4083.66,-3398.62 h66.93
  text "1" at 5269.69,-3398.62 h66.93
  text "of" at 5392.72,-3398.62 h66.93
  text "2" at 5500,-3398.62 h66.93
Mechanical 28:
  lines w7.87: -4818.9,-1584.65 -4754.92,-1584.65 ; -4818.9,252.95 -4754.92,252.95 ; -4818.9,2090.55 -4754.92,2090.55 ; -2667.32,-3484.25 -2667.32,-3421.26 ; -2667.32,3929.13 -2667.32,3992.13 ; -579.72,-3484.25 -579.72,-3421.26 ; -579.72,3929.13 -579.72,3992.13 ; 1507.87,-3484.25 1507.87,-3421.26 ; 1507.87,3929.13 1507.87,3992.13 ; 3595.47,-3484.25 3595.47,-3421.26 ; 3595.47,3929.13 3595.47,3992.13 ; 5683.07,-1583.66 5747.05,-1583.66 ; 5683.07,253.94 5747.05,253.94 ; 5683.07,2091.54 5747.05,2091.54 ; 5747.05,-3484.25 -4818.9,-3484.25 -4818.9,3992.13 5747.05,3992.13 5747.05,-3483.27 ; -4754.92,-3421.26 -4754.92,3929.13 5683.07,3929.13 5683.07,-3421.26 -4754.92,-3421.26
  text "5" at -3704.72,3949.8 h19.68
  text "4" at -1617.13,3948.82 h19.68
  text "3" at 470.47,3948.82 h19.68
  text "2" at 2558.07,3948.82 h19.68
  text "1" at 4643.7,3948.82 h19.68
  text "D" at 5722.44,3000 h19.68
  text "D" at -4779.53,2999.02 h19.68
  text "C" at 5722.44,1161.42 h19.68
  text "C" at -4779.53,1160.43 h19.68
  text "B" at 5722.44,-676.18 h19.68
  text "B" at -4779.53,-677.17 h19.68
  text "A" at 5722.44,-2512.8 h19.68
  text "A" at -4779.53,-2513.78 h19.68
  text "5" at -3704.72,-3463.58 h19.68
  text "4" at -1617.13,-3464.57 h19.68
  text "3" at 470.47,-3464.57 h19.68
  text "2" at 2558.07,-3464.57 h19.68
  text "1" at 4643.7,-3464.57 h19.68
Mechanical 29:
  drawing of 28 lines, arcs and shapes, not listed
  text "Board Title" at -2014.76,-2438.98 h98.43
  text "'.CreativeName' '.SubGfreq' '.SubGpower' Radio Board" at -2069.88,-2657.48 h137.8
  text "Page Title" at -2014.76,-2821.85 h98.43
  text "Approved:" at -1382.87,-2969.49 h66.93
  text "Designed:" at -745.08,-2969.49 h66.93
  text "Bottom Assembly" at -2069.88,-2975.39 h125.98
  text "RGU" at -1437.01,-3067.91 h86.61
  text ".DrawnByShort" at -805.12,-3067.91 h86.61
  text "Revision" at -4294.29,-3098.43 h66.93
  text "Document number" at -2014.76,-3109.25 h92.52
  text "BOM Doc. No:" at -938.98,-3156.5 h66.93
  text "Size" at -745.08,-3156.5 h66.93
  text ".BoardRevision" at -4304.69,-3218.5 h106.3
  text ".BoardName" at -2069.88,-3222.44 h125.98
  text "<>" at -961.61,-3229.33 h78.74
  text "A4" at -767.72,-3229.33 h78.74
  text "Sheet" at -4294.29,-3321.85 h66.93
  text "Sheet Modified Date:" at -3111.22,-3321.85 h66.93
  text "Sheet Created Date:" at -1992.13,-3321.85 h66.93
  text "Design Created Date:" at -745.08,-3321.85 h66.93
  text "2" at -4571.85,-3398.62 h66.93
  text "of" at -4464.57,-3398.62 h66.93
  text "2" at -4341.53,-3398.62 h66.93
  text "'.Print_Date'" at -3155.51,-3398.62 h66.93
  text "Monday, July 13, 2020" at -2036.42,-3398.62 h66.93
  text "Monday, July 13, 2020" at -787.4,-3398.62 h66.93
Mechanical 30:
  lines w7.87: -4990.16,-3739.17 6171.26,-3739.17 6171.26,4153.54 -4990.16,4153.54 -4990.16,-3739.17

## Text inside footprints (layer, text, board x,y; h text height)
Designator39: Mechanical 31 ":" at -517.72,6751.61 h90.55; Mechanical 31 "side. (CTE: Coefficient of Thermal Expansion)" at -339.96,6899.37 h90.55; Mechanical 31 "Vias opened on one side should be plugged only from the other" at -343.62,7055.98 h90.55; Mechanical 31 "Materials in compliance with the RoHS and WEEE directives" at -342.52,12606.3 h90.55; Mechanical 31 "Glass Epoxy FR-4, NEMA Class 2, UL 94V-0, Tg min 150 C" at -342.52,12763.78 h90.55; Mechanical 31 "to the bottom silkscreen. No marking on the boards is allowed!" at -342.52,11818.9 h90.55; Mechanical 31 "shall be put in the breakaway areas of the panel frame," at -342.52,11976.38 h90.55; Mechanical 31 "All PCB manufacturer's markings (Logo, Week/Year, UL)" at -342.52,12133.86 h90.55; Mechanical 31 "(Avoid areas reserved for DataMatrix, Barcodes or Lables)" at -342.52,12291.34 h90.55; Mechanical 31 "Logo, Week/Year, UL (ON SECONDARY SIDE (BOT))" at -342.52,12448.82 h90.55; Mechanical 31 "IPC-A-600 (current revisions) Class 2, and IPC specifications" at -342.52,11661.42 h90.55; Mechanical 31 "refered to by IPC-A-600" at -342.52,11503.94 h90.55; Mechanical 31 "otherwise." at -342.52,9299.21 h90.55; Mechanical 31 "- Inner radius (contour/outline) 1.2 mm, unless stated" at -342.52,9456.69 h90.55; Mechanical 31 "Use of V-CUT test pads is allowed." at -342.52,9614.17 h90.55; Mechanical 31 "V-CUT minimum remaining thickness 0.5 +/- 0.1 mm." at -342.52,9771.65 h90.55; Mechanical 31 "- If V-CUT, use angle 30 +/- 5 degrees." at -342.52,9929.13 h90.55; Mechanical 31 "by manufacturer for QA purposes." at -342.52,10086.61 h90.55; Mechanical 31 "- Break-away areas may be used for patterns, holes etc." at -342.52,10244.09 h90.55; Mechanical 31 "otherwise use (board manufacturer) standard Build-Up." at -342.52,10401.57 h90.55; Mechanical 31 "- If Build-Up (Stack-Up) is specified, follow Build-Up," at -342.52,10559.05 h90.55; Mechanical 31 "If applicable, the following requirements are valid:" at -342.52,10716.54 h90.55; Mechanical 31 "Gerber files (without alterations)" at -342.52,10874.02 h90.55; Mechanical 31 "Use the balancing of the panel that comes with the" at -342.52,11031.5 h90.55; Mechanical 31 "outline(s), without written consent/approval." at -342.52,11188.98 h90.55; Mechanical 31 "- Copper must not be added or removed from inside the board" at -342.52,11346.46 h90.55; Mechanical 31 "(Electroless Nickel/Immersion Gold)" at -342.52,8826.77 h90.55; Mechanical 31 "ENIG to meet IPC-4552 requirements (current revision)" at -342.52,8984.25 h90.55; Mechanical 31 "Thickness minimum 8 um." at -342.52,8196.85 h90.55; Mechanical 31 "to IPC-SM-840 Class T requirements (current revision)" at -342.52,8354.33 h90.55; Mechanical 31 "Photo Polymer Wet film" at -342.52,8511.81 h90.55; Mechanical 31 "Solder Mask Color: MATTE BLACK" at -342.52,8669.29 h90.55; Mechanical 31 "PLUGGED/FILLED, IPC-4761 (current revision) Type IV-b" at -342.52,7685.04 h90.55; Mechanical 31 "Plugged and Covered Both Sides, Low CTE non-conductive plugging" at -342.52,7527.56 h90.55; Mechanical 31 "material. If Type IV-b is not available as a process, Type IV-a" at -342.52,7370.08 h90.55; Mechanical 31 "for the Top Side, and Overprinted (Tented) Bot Side is OK." at -342.52,7212.6 h90.55; Mechanical 31 "Min via hole may have more than one pad diameter." at -347.36,5815.79 h90.55; Mechanical 31 "Minimum finished via hole diameter   : 0.25 mm (9.8 mils)" at -347.36,5973.27 h90.55; Mechanical 31 "Minimum via pad diameter" at -347.36,6130.75 h90.55; Mechanical 31 ":" at -504.84,6130.75 h90.55; Mechanical 31 "MINIMUM VIA" at -1922.17,6130.75 h90.55; Mechanical 31 ":" at -504.84,6288.23 h90.55; Mechanical 31 "Minimum conductor spacing" at -347.36,6288.23 h90.55; Mechanical 31 "Minimum conductor width" at -347.36,6445.71 h90.55; Mechanical 31 ":" at -504.84,6445.71 h90.55; Mechanical 31 "Cu TRACK(TRACE)" at -1922.17,6288.23 h90.55; Mechanical 31 "(SPECIFICATION CONTINUED ON NEXT PAGE)" at -1922.17,5500.83 h90.55; Mechanical 31 "NOMINAL VALUES for Width, Spacing and VIA Diameter:" at -1922.17,6603.19 h90.55; Mechanical 31 "BOARD THICKNESS" at -1917.32,13078.74 h90.55; Mechanical 31 "BOARD SIZE" at -1917.32,13236.22 h90.55; Mechanical 31 "PANEL SIZE" at -1917.32,13393.7 h90.55; Mechanical 31 "BOARDS pr PANEL" at -1917.32,13551.18 h90.55; Mechanical 31 "PREPARED BY" at -1917.32,13708.66 h90.55; Mechanical 31 "-------------------------------------------------------------------------" at -1917.32,13866.14 h90.55; Mechanical 31 "REVISION" at -1917.32,14023.62 h90.55; Mechanical 31 "DATE" at -1917.32,14181.1 h90.55; Mechanical 31 "DOCUMENT/BOARD" at -1917.32,14496.06 h90.55; Mechanical 31 "PRODUCT OWNER" at -1917.32,14653.54 h90.55; Mechanical 31 ":" at -500,13078.74 h90.55; Mechanical 31 ":" at -500,11346.46 h90.55; Mechanical 31 ":" at -500,11661.42 h90.55; Mechanical 31 ":" at -500,12448.82 h90.55; Mechanical 31 ":" at -500,12763.78 h90.55; Mechanical 31 ":" at -500,12921.26 h90.55; Mechanical 31 "NO OF LAYERS" at -1917.32,12921.26 h90.55; Mechanical 31 "MATERIAL(S)" at -1917.32,12763.78 h90.55; Mechanical 31 "MARKINGS" at -1917.32,12448.82 h90.55; Mechanical 31 "QUALITY REQ." at -1917.32,11661.42 h90.55; Mechanical 31 "GENERAL REQ." at -1917.32,11346.46 h90.55; Mechanical 31 ":" at -500,7685.04 h90.55; Mechanical 31 ":" at -500,8669.29 h90.55; Mechanical 31 ":" at -500,8984.25 h90.55; Mechanical 31 ":" at -500,9141.73 h90.55; Mechanical 31 "COPPER THK." at -1917.32,9141.73 h90.55; Mechanical 31 "COPPER PASSIV." at -1917.32,8984.25 h90.55; Mechanical 31 "RESIST MASK" at -1917.32,8669.29 h90.55; Mechanical 31 "VIA HOLES" at -1917.32,7685.04 h90.55; Mechanical 31 "LEGEND/SILKSCR." at -1922.17,6760.67 h90.55; Mechanical 31 "SEE BUILD-UP" at -342.52,9141.73 h90.55; Mechanical 31 "WHITE, BOTH SIDES (TOP + BOT)" at -327.68,6760.67 h90.55; Mechanical 31 "4" at -342.52,12921.26 h90.55; Mechanical 31 "1.6 mm +/-10%" at -342.52,13078.74 h90.55; Mechanical 31 "30.0 x 45.0 mm" at -342.52,13236.22 h90.55; Mechanical 31 "210.2 x 205.4 mm" at -342.52,13393.7 h90.55; Mechanical 31 "12 (4 x 3)" at -342.52,13551.18 h90.55; Mechanical 31 "Silicon Labs" at -342.52,14653.54 h90.55; Mechanical 31 "Page 1" at 1389.76,5204.72 h90.55; Mechanical 31 "Cu TRACK(TRACE)" at -1922.17,6445.71 h90.55; Mechanical 31 ":" at -500,13236.22 h90.55; Mechanical 31 ":" at -500,13393.7 h90.55; Mechanical 31 ":" at -500,13551.18 h90.55; Mechanical 31 ":" at -500,13708.66 h90.55; Mechanical 31 ":" at -500,14023.62 h90.55; Mechanical 31 ":" at -500,14181.1 h90.55; Mechanical 31 ":" at -500,14496.06 h90.55; Mechanical 31 ":" at -500,14653.54 h90.55; Mechanical 31 "<------------------------------------------------------------------------ 1(2)" at -1917.32,15125.98 h90.55; Mechanical 31 "*** PCB SPECIFICATION FOR BARE BOARD MANUFACTURING ***" at -1917.32,14968.5 h90.55; Mechanical 31 "-------------------------------------------------------------------------" at -1917.32,14811.02 h90.55; Mechanical 31 "If needed, removal of thin (less than 0.25mm) solder" at -342.52,8039.37 h90.55; Mechanical 31 "resist dams (between QFNand BGA pads) is allowed." at -342.52,7862.2 h90.55; Mechanical 31 ": 0.50 mm (20 mils)" at 2868.11,6130.71 h90.55; Mechanical 31 ": 0.10 mm (4 mils)" at 2866.14,6288.39 h90.55; Mechanical 31 ": 0.10 mm (4 mils)" at 2867.13,6444.49 h90.55; Mechanical 32 "NPTH +/− 0.10 mm for d > 5.3 mm" at -1910.63,8492.91 h90.55; Mechanical 32 "NPTH +/− 0.10 mm for d <= 5.3 mm" at -1910.63,8626.57 h90.55; Mechanical 32 "PTH +/− 0.20 mm for d > 5.3 mm" at -1910.83,8759.45 h90.55; Mechanical 32 "PTH +/− 0.15 mm for 2.0 < d <= 5.3 mm" at -1913.39,8889.57 h90.55; Mechanical 32 "PTH +/− 0.10 mm for d <= 2.0 mm" at -1912.01,9024.41 h90.55; Mechanical 32 "Nominal tolerances (if no other tolerancces given)" at -1912.4,9187.2 h90.55; Mechanical 32 "Please follow the gerbers!" at -1925.83,7772.48 h90.55; Mechanical 32 "L1 =====" at -500,14338.58 h90.55; Mechanical 32 "TOP ====" at -500,14653.54 h90.55; Mechanical 32 "| |// PREPREG or CORE ////// 300um *" at 208.66,14496.06 h90.55; Mechanical 32 "| |========================= 30-38 um Cu (ca) After plating" at 208.66,14653.54 h90.55; Mechanical 32 "/////" at -500,14496.06 h90.55; Mechanical 32 "| |========================= 11-18 um Cu" at 208.66,14338.58 h90.55; Mechanical 32 "| |// PREPREG or CORE ////// **" at 208.66,14181.1 h90.55; Mechanical 32 "| |========================= 11-18 um Cu" at 208.66,14023.62 h90.55; Mechanical 32 "| |// PREPREG or CORE ////// 300um *" at 208.66,13866.14 h90.55; Mechanical 32 "| |========================= 30-38 um Cu (ca) After plating" at 208.66,13708.66 h90.55; Mechanical 32 "<------------------------------------------------------------------------ 2(2)" at -1917.32,15125.98 h90.55; Mechanical 32 "/////" at -500,14181.1 h90.55; Mechanical 32 "L2 =====" at -500,14023.62 h90.55; Mechanical 32 "− − −" at -500,13866.14 h90.55; Mechanical 32 "BOT ====" at -500,13708.66 h90.55; Mechanical 32 "*)" at -500,13393.7 h90.55; Mechanical 32 "The distance between Top-L1 and Bottom-L2 should be" at -500,13236.22 h90.55; Mechanical 32 "as close to 300 um as possible! +/-25um tolerance is allowed." at -500,13078.74 h90.55; Mechanical 32 "**)" at -500,12763.78 h90.55; Mechanical 32 "Select Center Prepreg thickness in order to reach specified" at -500,12606.3 h90.55; Mechanical 32 "board thickness" at -500,12448.82 h90.55; Mechanical 32 "100% Electrical Test" at -342.52,11976.38 h90.55; Mechanical 32 "Optical test, AOI (with automatic scanner)" at -342.52,11818.9 h90.55; Mechanical 32 "Visual inspection" at -342.52,11661.42 h90.55; Mechanical 32 "(Generate netlist from Gerber and Drill files)" at -342.52,11503.94 h90.55; Mechanical 32 "Avoid use of 2125 Prepreg" at -342.52,11188.98 h90.55; Mechanical 32 "--------------------------------------------------------------------------------" at -1917.32,10599.41 h90.55; Mechanical 32 "NC DRILL - HOLE INFORMATION:" at -1917.32,10459.33 h90.55; Mechanical 32 "Drill dimensions must be taken from the Excellon (.DRL) file(s), and" at -972.44,10284.45 h90.55; Mechanical 32 "the drill report file(s) (.DRR)." at -972.44,10126.97 h90.55; Mechanical 32 "NON-PLATED holes may have a small center marker in the Gerber files." at -972.44,9969.49 h90.55; Mechanical 32 "Under no circumstance must these Gerber flashes be mistaken for the" at -972.44,9812.01 h90.55; Mechanical 32 "hole drill dimensions!" at -972.44,9654.53 h90.55; Mechanical 32 "The drill data may contain slots (in a separate file)." at -1917.32,9497.05 h90.55; Mechanical 32 "Dimensions for the finished board (after plating)." at -1912.4,9338.39 h90.55; Mechanical 32 "--------------------------------------------------------------------------------" at -1927.76,7215.75 h90.55; Mechanical 32 "--------------------------------------------------------------------------------" at -1918.94,8356.97 h90.55; Mechanical 32 "BUILD UP" at -1917.32,14811.02 h90.55; Mechanical 32 ":" at -500,14811.02 h90.55; Mechanical 32 ":" at -500,11976.38 h90.55; Mechanical 32 "TEST" at -1917.32,11976.38 h90.55; Mechanical 32 "WARNING" at -1917.32,10284.45 h90.55; Mechanical 32 ":" at -1129.92,10284.45 h90.55; Mechanical 32 "Page 2" at 1389.76,5204.72 h90.55; Mechanical 32 "The board may contain a special testpoint on the bottom layer with an exposed" at -1923.46,8095.79 h90.55; Mechanical 32 "ground copper ring around the testpoint. This exposed copper ring is intentional." at -1921.3,7931.85 h90.55; Mechanical 32 "Fiducials could also have different solrder mask size/shape exposing or covering" at -1923.46,7486.73 h90.55; Mechanical 32 "the surrounding copper. Please follow the gerbers for those as well!" at -1923.07,7346.97 h90.55
P200: Mechanical 12 "40" at 1049.55,1183.73 h15.75 r180; Mechanical 12 "1" at 113.55,1105.73 h15.75 r180; Mechanical 12 "2" at 109.55,1185.73 h15.75 r180; Bottom Overlay "40" at 1133.86,1212.6 h49.21; Bottom Overlay "1" at 78.74,1055.12 h49.21
P201: Mechanical 12 "2" at 109.55,240.85 h15.75 r180; Mechanical 12 "1" at 113.55,160.85 h15.75 r180; Mechanical 12 "40" at 1049.55,238.85 h15.75 r180; Bottom Overlay "1" at 86.61,110.24 h49.21; Bottom Overlay "40" at 1133.86,267.72 h49.21